# Altium PCB Servo Controller Board.PcbDoc
Units mm, origin at the board's own origin, x right, y up, seen from the top; angles counter-clockwise.
Board outline 99 x 43 mm, 2 copper layers (Top Layer, Bottom Layer), stack 1.57 mm thick; 27 components, 20 nets, 140 pads, 312 vias.
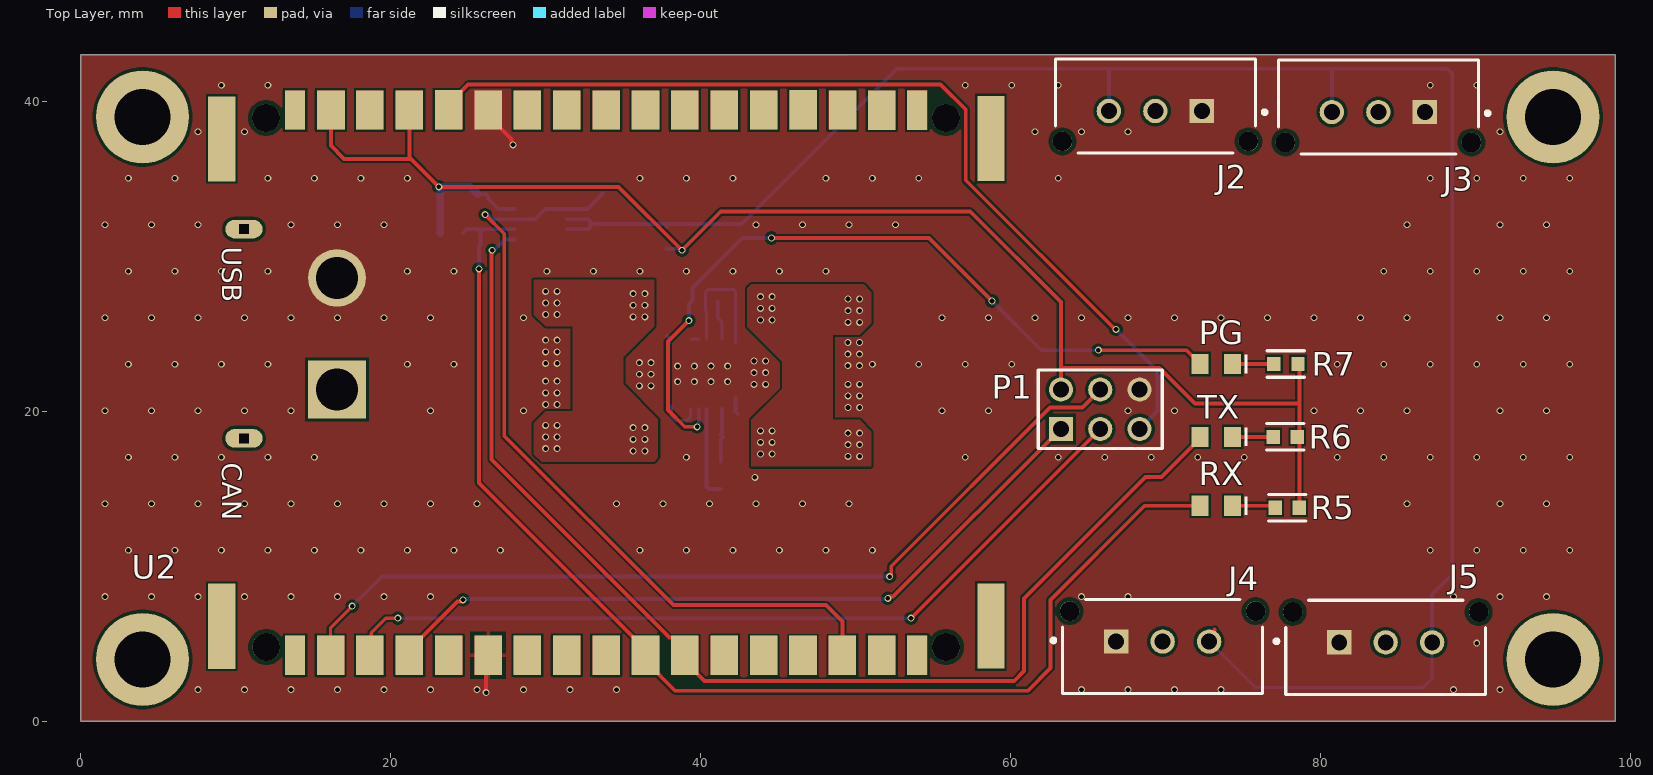
[diagram p0: Top Layer view]
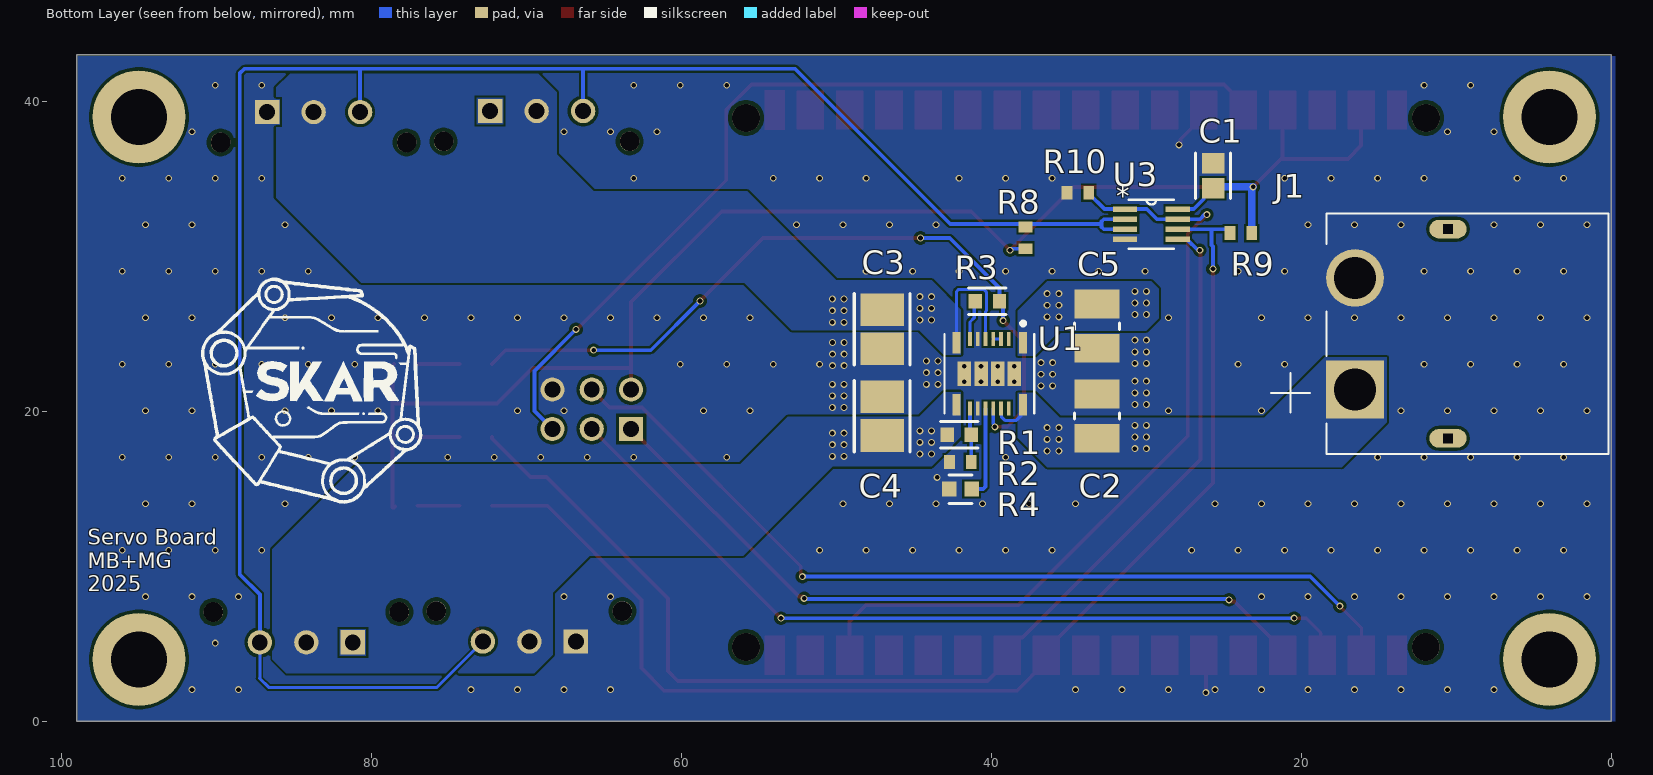
[diagram p1: Bottom Layer view, seen from below]
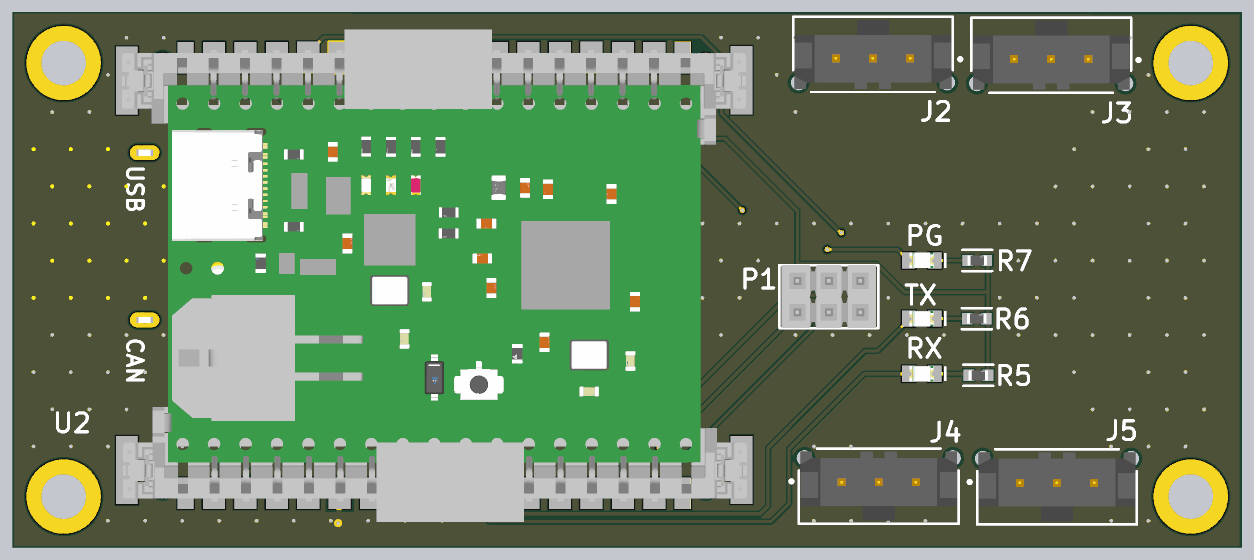
[diagram p2: 3D render of the assembled board from above, using the file's embedded part models]
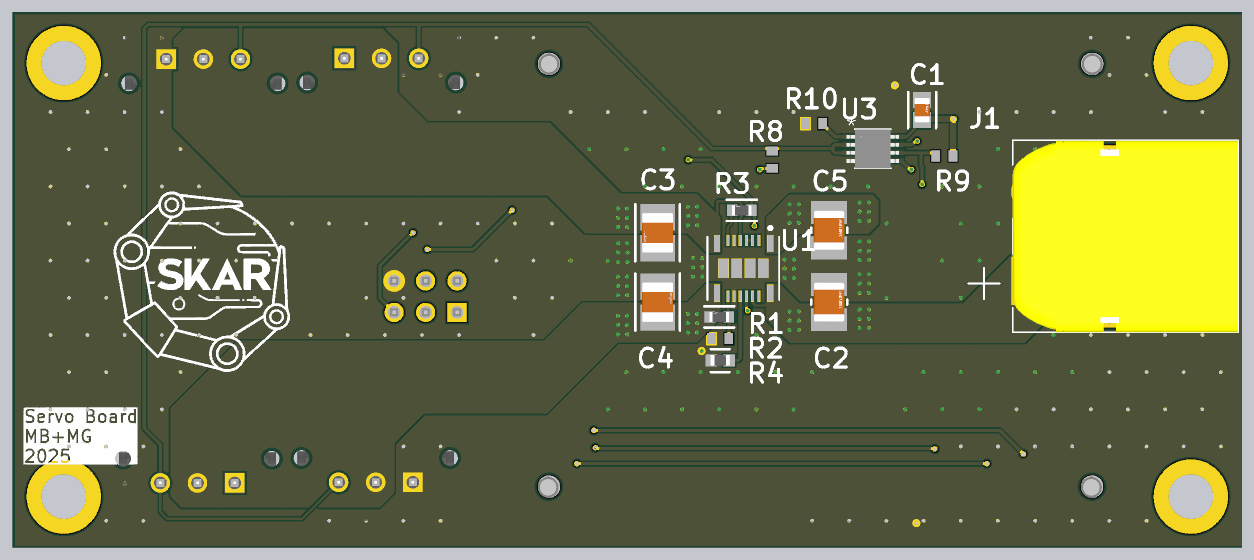
[diagram p3: 3D render of the assembled board from below, using the file's embedded part models]

## Layer stack, top to bottom
Top Solder: solder mask 0.0102, Solder Resist, Dk 3.5
Top Layer: signal copper 0.0356
Dielectric 1: core 1.4986, Core-043, Dk 4.3
Bottom Layer: signal copper 0.0356
Bottom Solder: solder mask 0.0102, Solder Resist, Dk 3.5

## Board outline
0,0 0,43 99,43 99,0

## Design rules (kind name [scope] priority, off if disabled: settings)
Clearance [All] p1: gap=0.254 ignorepadtopadclearanceinfootprint=FALSE except(0.1: Arc-Arc Arc-Track Track-Track; 0.127: Arc-THPad Arc-Fill Arc-Poly Arc-Region Track-THPad Track-Fill Track-Poly Track-Region SMDPad-SMDPad SMDPad-Fill SMDPad-Poly SMDPad-Region Fill-Fill Fill-Poly Fill-Region Poly-Poly Poly-Region Region-Region; 0.2: Arc-SMDPad Track-SMDPad THPad-Fill THPad-Poly THPad-Region Via-Fill Via-Poly Via-Region; 0.5: THPad-THPad)
ComponentClearance [All] p1: gap=0.127 collisioncheckmode=3 verticalgap=0.254 showdistances=FALSE
HoleSize [All] p1: absolutevalues=TRUE maxlimit=6.5 minlimit=0.025 maxpercent=80.000 minpercent=20.000
MinimumSolderMaskSliver [All] p1: minsoldermaskwidth=0.08
PlaneClearance [All] p1: clearance=0.2
PlaneConnect [All] p1: planeconnectstyle=Direct reliefexpansion=0.508 reliefentries=4 reliefconductorwidth=0.254 reliefairgap=0.254
PolygonConnect [All] p1: connectstyle=Direct reliefconductorwidth=0.254 reliefentries=4 polygonreliefangle="90 Angle" airgapwidth=0.254
RoutingVias [All] p1: holewidth=0.3 width=0.45 viastyle="Through Hole" minholewidth=0.3 minwidth=0.45 maxholewidth=5 maxwidth=5
SilkToSilkClearance [All] p1: silktosilkclearance=0
SilkToSolderMaskClearance [IsPad] p1: minsilkscreentomaskgap=0.15 clearancetoexposedcopper=TRUE
SolderMaskExpansion [All] p1: expansion=0.1 istentingtop=FALSE
SupplyNets "Schematic Supply Nets_1" [InNet('+5')] p1: voltage=0.000
SupplyNets "Schematic Supply Nets" [InNet('GND')] p2: voltage=0.000
Width [All] p1: maxlimit=0.5 minlimit=0.127 preferedwidth=0.2 minimp=50.000000 maximp=50.000000 favimp=50.000000
23 further rules are at their usual default settings.

## Components (designator, comment, footprint, x,y, rotation, side; value= is the part's Value field where it differs from the comment)
C1 "100nF" FP-0805-L_2_01_0_2-W_1_25-IPC_B 25.7,35.2 r90 bottom
C2 "10uF" FP-CL32-IPC_A 33.2,19.7 r90 bottom
C3 "47uF" FP-GRM32E-0_3-0_2-IPC_A 47.05,25.3 r270 bottom
C4 "47uF" FP-GRM32E-0_3-0_2-IPC_A 47.05,19.7 r90 bottom
C5 "10uF" FP-CL32-IPC_A 33.2,25.5 r90 bottom
J1 "XT60PW-M" AMASS_XT60PW-M 10.541,25.013 r270 bottom
J2 "43650-0328" FP-43650-0328-MFG 69.342,39.698 r0 top
J3 "43650-0328" FP-43650-0328-MFG 83.731,39.632 r0 top
J4 "43650-0328" FP-43650-0328-MFG 69.812,4.839 r180 top
J5 "43650-0328" FP-43650-0328-MFG 84.201,4.784 r180 top
P1 "MTSW-103-07-F-D-244" SMTC-MTSW-103-07-X-D-244 63.246,18.87 r0 top
PG "150080YS75000" WL-SMCW_0805_150080xx75000 73.279,23.061 r180 top
R1 "110k" FP-AC0603-IPC_B 42.073,18.5 r0 bottom
R2 "10k" RESC1608X55X25NL10T15 42,16.75 r180 bottom
R3 "100k" FP-AC0603-IPC_B 40.259,27.105 r0 bottom
R4 "6,49k" FP-CRCW0603-e3-IPC_B 42,15 r180 bottom
R5 "1k" FP-RC0603-0_55-IPC_B 77.851,13.79 r0 top
R6 "1k" FP-RC0603-0_55-IPC_B 77.724,18.362 r0 top
R7 "1k" FP-RC0603-0_55-IPC_B 77.766,23.061 r0 top
R8 "10k" RESC1608X55X25NL10T15 37.8,31.2 r270 bottom
R9 "10k" RESC1608X55X25NL10T15 23.9,31.5 r180 bottom
R10 "10k" RESC1608X55X25NL10T15 34.417,34.11 r180 bottom
RX "150080YS75000" WL-SMCW_0805_150080xx75000 73.279,13.917 r180 top
TX "150080YS75000" WL-SMCW_0805_150080xx75000 73.279,18.362 r180 top
U1 "PTPSM63606RDLR" RDL0020A-MFG 40.132,22.426 r270 bottom
U2 "CANduino on 299-017-299198-1 socket" "CANduino on 299-017-299198-1 socket" 33.655,21.283 r180 top locked
U3 "SN74LVC2G241DCTR" DCT8 29.681,32.078 r180 bottom

## Footprints (in the part's own frame and the unit in brackets; to place one, negate y for a bottom-side part, rotate by r counter-clockwise, add the part's x,y. Pads: shape width x height; smd on the part's side, far side on the other; paste and mask are expansions set on the pad)
AMASS_XT60PW-M [mm]
  rect 3.716x3.716 / inner round 3.716 / far side rect 3.716x3.716 hole 2.7: 1(3.6,-6)
  round 3.716 hole 2.7: 2(-3.6,-6)
  oval 1.2x2.4 hole 0.6 square: S1(6.75,0) S2(-6.75,0)
  silkscreen extent -7.75,-11.43 7.75,10.35, body extent -7.75,-7.85 7.75,10.35, height 8.4
"CANduino on 299-017-299198-1 socket" [mil]
  rect 50.79x100 smd: 1(780,670) 17(-800,670) 18(-800.11,-714.83) 34(780,-715)
  rect 70.08x100 smd: 2(690,670) 3(590,670) 4(490,670) 5(390,670) 6(290,670) 7(190,670) 8(90,670) 9(-10,670) 10(-110,670) 11(-210,670) 12(-310,670) 13(-410,670) 14(-510,670) 15(-610,670) 16(-710,670) 19(-709.78,-714.61) 20(-610.61,-715.01) 21(-510.24,-715.41) 22(-410,-715) 23(-310,-715) 24(-210,-715) 25(-110,-715) 26(-10,-715) 27(90,-715) 28(190,-715) 29(290,-715) 30(390,-716) 31(490,-715) 32(590,-715) 33(689,-715)
  round 70.87 hole 70.87 unplated: 35(-873,649) 36(-873,-695) 37(854,-695) 38(853.39,649)
  rect 68.9x216.54 smd: MP1(966.54,596.46) MP2(-987.2,595.47) MP3(-987.2,-642.72) MP4(966.54,-641.73)
  Top Layer region: -826.02,-765.37 -774.65,-765.37 -774.65,-664.73 -826.02,-664.73
  Top Layer region: -745,-765 -675,-765 -675,-665 -745,-665
  Top Layer region: -645,-765 -575,-765 -575,-665 -645,-665
  Top Layer region: -545,-765 -475,-765 -475,-665 -545,-665
  Top Layer region: -445,-765 -375,-765 -375,-665 -445,-665
  Top Layer region: -345,-765 -275,-765 -275,-665 -345,-665
  Top Layer region: -245,-765 -175,-765 -175,-665 -245,-665
  Top Layer region: -145,-765 -75,-765 -75,-665 -145,-665
  Top Layer region: -45,-765 25,-765 25,-665 -45,-665
  Top Layer region: 55,-765 125,-765 125,-665 55,-665
  Top Layer region: 155,-765 225,-765 225,-665 155,-665
  Top Layer region: 255,-765 325,-765 325,-665 255,-665
  Top Layer region: 355,-765 425,-765 425,-665 355,-665
  Top Layer region: 455,-765 525,-765 525,-665 455,-665
  Top Layer region: 555,-765 625,-765 625,-665 555,-665
  Top Layer region: 655,-765 725,-765 725,-665 655,-665
  Top Layer region: 755,-765 805.71,-765 805.71,-665 755,-665
  Top Layer region: 455,620 525,620 525,720 455,720
  Top Layer region: 355,620 425,620 425,720 355,720
  Top Layer region: -145,620 -75,620 -75,720 -145,720
  Top Layer region: -245,620 -175,620 -175,720 -245,720
  Top Layer region: -345,620 -275,620 -275,720 -345,720
  Top Layer region: 755,620 805.71,620 805.71,720 755,720
  Top Layer region: 655,620 725,620 725,720 655,720
  Top Layer region: 555,620 625,620 625,720 555,720
  Top Layer region: 255,620 325,620 325,720 255,720
  Top Layer region: 155,620 225,620 225,720 155,720
  Top Layer region: 55,620 125,620 125,720 55,720
  Top Layer region: -45,620 25,620 25,720 -45,720
  Top Layer region: -445,620 -375,620 -375,720 -445,720
  Top Layer region: -545,620 -475,620 -475,720 -545,720
  Top Layer region: -645,620 -575,620 -575,720 -645,720
  Top Layer region: -745,620 -675,620 -675,720 -745,720
  Top Layer region: -826.02,619.63 -774.65,619.63 -774.65,720.27 -826.02,720.27
  body extent -1004,-804 982,761, height 515
DCT8 [mil]
  rect 61.5x14 smd paste-30.75 mask-31: 1(-66.75,38.39) 2(-66.75,12.8) 3(-66.75,-12.8) 4(-66.75,-38.39) 5(66.75,-38.39) 6(66.75,-12.8) 7(66.75,12.8) 8(66.75,38.39)
  silkscreen extent -57,-62 57,62, body extent -84,-62 84,62, height 51
FP-0805-L_2_01_0_2-W_1_25-IPC_B [mm]
  rect 1.305x1.456 smd paste+0 mask+0: 1(-0.806,0) 2(0.806,0)
  silkscreen extent -1.46,-1.13 1.46,1.13, body extent -1,-0.63 1,0.63, height 1.4
FP-43650-0328-MFG [mm]
  rect 1.57x1.57 hole 1.02 paste-2539.97 mask+0: 1(3,-0.315)
  round 1.57 hole 1.02 paste-2539.97 mask+0: 2(0,-0.315) 3(-3,-0.315)
  round 1.27 hole 1.27 unplated paste-2539.97 mask+0: ""(-6,-2.275) ""(6,-2.275)
  silkscreen extent -6.45,-3.04 7.18,3.04, body extent -6.74,-3.14 6.74,3.14, height 0.25
FP-AC0603-IPC_B [mm]
  rect 0.859x0.912 smd paste+0 mask+0: 1(-0.777,0) 2(0.777,0)
  silkscreen extent -1.21,-0.86 1.21,0.86, body extent -0.8,-0.4 0.8,0.4, height 0.55
FP-CL32-IPC_A [mm]
  rect 1.853x2.904 smd paste+0 mask+0: 1(-1.425,0) 2(1.425,0)
  silkscreen extent -0.2,-1.45 0.2,1.45, body extent -1.6,-1.25 1.6,1.25, height 2.8
FP-CRCW0603-e3-IPC_B [mm]
  rect 0.935x0.962 smd paste+0 mask+0: 1(-0.715,0) 2(0.715,0)
  silkscreen extent -0.75,-0.95 0.75,0.9, body extent -0.77,-0.43 0.77,0.43, height 0.5
FP-GRM32E-0_3-0_2-IPC_A [mm]
  rect 2.103x2.806 smd paste+0 mask+0: 1(-1.251,0) 2(1.251,0)
  silkscreen extent -2.3,-1.8 2.3,1.8, body extent -1.6,-1.25 1.6,1.25, height 2.7
FP-RC0603-0_55-IPC_B [mm]
  rect 0.859x0.912 smd paste+0 mask+0: 1(-0.777,0) 2(0.777,0)
  silkscreen extent -1.21,-0.86 1.21,0.86, body extent -1.46,-0.71 1.46,0.71, height 0.25
RDL0020A-MFG [mm]
  rect 1.4x0.5 smd paste-0.687 mask+0: 1(-2,2.175) 8(-2,-2.125) 9(2,-2.125) 16(2,2.175)
  rect 0.9x0.25 smd paste-0.437 mask+0: 2(-2.25,1.25) 3(-2.25,0.75) 4(-2.25,0.25) 5(-2.25,-0.25) 6(-2.25,-0.75) 7(-2.25,-1.25) 10(2.25,-1.25) 11(2.25,-0.75) 12(2.25,-0.25) 13(2.25,0.25) 14(2.25,0.75) 15(2.25,1.25)
  rect 1.58x0.875 smd paste-0.777 mask+0: 17(0,1.613) 18(0,0.538) 19(0,-0.538) 20(0,-1.613)
  silkscreen extent -3.37,-2.9 2.55,2.9
RESC1608X55X25NL10T15 [mm] "Chip Resistor, 2-Leads, Body 1.70x0.90mm, IPC Medium Density"
  rect 0.7x0.9 smd: 1(-0.7,0) 2(0.7,0)
  body extent -0.85,-0.45 0.85,0.45, height 0.55
SMTC-MTSW-103-07-X-D-244 [mm] "Assembly .025\" [.64] SQ Post Terminal Strip, 2x3 Pins, Vertical, 2.54mm Pitch, Male"
  rect 1.55x1.55 hole 1.02: 1(0,0)
  round 1.55 hole 1.02: 2(0,2.54) 3(2.54,0) 4(2.54,2.54) 5(5.08,0) 6(5.08,2.54)
  silkscreen extent -1.46,-1.27 6.54,3.81, body extent -1.27,-1.27 6.35,3.81, height 8.74
WL-SMCW_0805_150080xx75000 [mm] "SMD Mono-color Chip LED, body 2.0x1.25mm"
  rect 1.1x1.3 smd: 1(-1.05,0) 2(1.05,0)
  silkscreen extent -2,-0.6 -1.8,0.6, body extent -1,-0.63 1,0.62, height 0.7

## Part data
C1: library part CMP-2007-04172-2, "Automotive Ceramic Capacitor, 0805, 100nF, 10%, X7R, 15%, 100V", Case Code (Imperial)=0805, Case Code (Metric)=2012, Dielectric=X7R, Dielectric Material=Ceramic, Max Operating Temperature=125°C, Min Operating Temperature=-55°C, Package Quantity=1, Ratings=AEC-Q200, Tolerance=10%, Voltage=100V, Capacitance=100nF, Case/Package=0805, Construction=Flat, Depth=1.25mm, Height=1.4mm, Lead Free="Lead Free", Length=2.01mm, Mount="Surface Mount", Number of Pins=2, Packaging="Tape and Reel", Radiation Hardening=No, REACH SVHC="No SVHC", RoHS Compliant=Yes, Series=-, Termination=SMD/SMT, Thickness=0.055inch, Voltage Rating=100V, Voltage Rating (DC)=100V, Width=0.049inch
C2 C5: library part CMP-13271-002443-1, "Cap Ceramic 10uF 35V X7R ±10% SMD 1210 +125°C Embossed T/R", Case Code (Imperial)=1210, Case Code (Metric)=3225, Dielectric=X7R, Max Operating Temperature=125°C, Min Operating Temperature=-55°C, Package Quantity=1, Tolerance=10%, Voltage=35V, Capacitance=10uF, Case/Package=1210, Depth=2.5mm, Height=1.8mm, Lead Free="Lead Free", Length=3.2mm, Material=Ceramic, Mount="Surface Mount", Packaging="Tape and Reel", Radiation Hardening=No, Thickness=0.079inch, Voltage Rating=35V, Width=0.098inch
C3 C4: library part CMP-06035-000110-2, "Chip Multilayer Ceramic Capacitors for General Purpose, 1210, 47uF, X6S, 22%, 10%, 16V", Case Code (Imperial)=1210, Case Code (Metric)=3225, Dielectric=X6S, Max Operating Temperature=105°C, Min Operating Temperature=-55°C, Package Quantity=1000, Tolerance=10%, Voltage=16V, Capacitance=47uF, Case/Package=1210, Depth=2.5mm, Height=2.5mm, Lead Free="Lead Free", Length=3.2mm, Material=Ceramic, Mount="Surface Mount", Packaging="Tape and Reel", REACH SVHC="No SVHC", Termination=SMD/SMT, Thickness=0.106inch, Voltage Rating=16V, Voltage Rating (DC)=16V, Weight=0.00388oz, Width=2.5mm
J1: "Socket, DC supply, male, PIN: 2", Package=Package, Availability="Not in stock", Check_prices=https://www.snapeda.com/parts/XT60PW-M/AMASS/view-part/?ref=eda, MF=AMASS, MP=XT60PW-M, Price=None, SnapEDA_Link=https://www.snapeda.com/parts/XT60PW-M/AMASS/view-part/?ref=snap
J2 J3 J4 J5: library part CMP-00257-07661218-1, "43650-0328 Connector Header HDR 3 POS 3mm Solder ST Thru-Hole 3 Terminal 1 Port Micro-Fit 3.0 Tray", Current Rating=5A, Manufacturer Lifecycle Status=ACTIVE, Max Operating Temperature=125°C, Min Operating Temperature=-40°C, Voltage Rating=600V, Contact Material="Brass, Gold, Nickel", Contact Plating=Gold, Country of Origin=US, Glow Wire Compliant=Compliant, Halogen Free="Low Halogen", Height=10.15mm, Housing Material=Thermoplastic, Lifecycle Status=Production, Mount="Through Hole", NexarPartId=7661218, Number of Circuits=3, Number of Contacts=3, Number of Positions=3, Number of Rows=1, Orientation=Vertical, Pitch=3mm, Plating=Tin, Radiation Hardening=No, RoHS=Compliant, Schedule B=8536694040, Termination="Through Hole"
P1: library part CMP-1024-00098-1, "Modified .025\" SQ Post Header, Through-hole, Vertical, -55 to 125 degC, 2.54 mm Pitch, 6-Pin, Male, RoHS", Manufacturer=Samtec, Temperature Range="-55 to 125 degC", ComponentLink1Description="Manufacturer URL", ComponentLink1URL=http://www.samtec.com, ComponentLink2Description=Datasheet, ComponentLink2URL=http://www.samtec.com/documents/webfiles/pdf/MTSW.PDF, ComponentLink3Description="Package Specification", ComponentLink3URL=http://www.samtec.com/documents/webfiles/cpdf/MTSW-XXX-XX-X-X-XXXX-XX-XXX-MKT1.pdf, DatasheetVersion=F-214, Mounting Technology=Through-hole, Orientation=Vertical, PackageDescription="Assembly .025\" [.64] SQ Post Terminal Strip", PackageReference=MTSW-103-07-X-D-244, PackageVersion="BI, 2/1987", PartNumber=MTSW-103-07-F-D-244, Pitch="2.54 mm", RoHS=True
PG RX TX: library part CMP-1426-00012-3, "2 V Yellow LED 2012 (0805) SMD, Wurth Elektronik WL-SMCW 150080YS75000", Case Code (Imperial)=0805, Case Code (Metric)=2012, Color=Yellow, Forward Current=100mA, Forward Voltage=2V, Max Junction Temperature (Tj)=95°C, Max Operating Temperature=85°C, Max Reverse Voltage (DC)=5V, Min Operating Temperature=-40°C, Power Dissipation=72mW, Test Current=20mA, Case/Package=0805, Dominant Wavelength=590nm, Height=700µm, Length=2mm, Lens Style="Clear, Rectangular", Luminous Intensity=120mcd, Mount="Surface Mount", Packaging="Tape and Reel", Peak Wavelength=595nm, REACH SVHC=Unknown, Reverse Voltage=5V, RoHS=Compliant, Viewing Angle=140°, Wavelength=590nm, Width=1.25mm
R1: library part CMP-03412-026184-2, "RES 110KΩ 1.00% 0.1W 0603", Case Code (Imperial)=0603, Case Code (Metric)=1608, Max Operating Temperature=155°C, Max Power Dissipation=100mW, Min Operating Temperature=-55°C, Resistance=110kR, Resistor Type="Thick Film", Temperature Coefficient=100ppm/°C, Tolerance=1%, Voltage Rating=50V, Case/Package=0603, Features="Moisture Resistant", Height=0.022inch, Length=0.063inch, Number of Terminations=2, Packaging="Tape and Reel", Power Rating=100mW, RoHS Compliant=Yes, Series=AC, Termination=SMD/SMT, Width=0.8mm
R2 R8 R9 R10: library part CMP-2000-05022-1, "Resistor, 10 KOhm, +/- 5%, 100 mW, -55 to 155 degC, 0603 (1608 Metric), RoHS, Tape and Reel", Case Code - in=0603, Case Code - mm=1608, Manufacturer=Yageo, Operating Temperature Range=-55Cto+155C, Package Description="2-Pin Surface Mount Device, Body 1.6 x 0.8 mm", Package Reference=603, Power Rating=100mW, Resistance=10kOhms, Temperature Coefficient=100PPM/C, Tolerance=5%, Voltage Rating=50V, Datasheet URL=http://www.farnell.com/datasheets/443971.pdf, Datasheet Version="Rev. 4, 04/2009", Manufacturer URL=http://www.yageo.com/, Packaging=Reel, Product=ThickFilmResistorsGeneralPurpose, Series=RC, Termination Style=SMD/SMT
R3: library part CMP-2000-04816-3, "RES 100KΩ 1.00% 0.1W 0603", Case Code (Imperial)=0603, Case Code (Metric)=1608, Max Operating Temperature=155°C, Max Power Dissipation=100mW, Min Operating Temperature=-55°C, Package Quantity=1, Ratings=AEC-Q200, Resistance=100kR, Resistor Type="Thick Film", Temperature Coefficient=100ppm/°C, Tolerance=1%, Voltage Rating=50V, Working Voltage=75V, Case/Package=0603, Construction=Rectangular, Depth=0.8mm, Features="Moisture Resistant", Height=0.022inch, Lead Free="Lead Free", Length=1.6mm, Military Standard=Not, Moisture Sensitivity Level=1, Number of Terminations=2, Packaging="Tape and Reel", Power Rating=100mW, RoHS Compliant=Yes, Series=AC, Technology="THICK FILM", Termination=SMD/SMT, Width=0.031inch
R4: library part CMP-2000-03548-2, "RES Thick Film, 6.49kΩ, 1%, 0.1W, 100ppm/°C, 0603", Case Code (Imperial)=0603, Case Code (Metric)=1608, Max Operating Temperature=155°C, Max Power Dissipation=100mW, Min Operating Temperature=-55°C, Package Quantity=10, Resistance=6.49kR, Temperature Coefficient=100ppm/°C, Tolerance=1%, Voltage Rating=75V, Case/Package=0603, Composition="Thick Film", Contact Plating=Tin, Depth=0.85mm, Features="Automotive AEC-Q200", Height=0.45mm, Length=1.55mm, Military Standard=Not, Number of Pins=2, Number of Terminations=2, Packaging="Tape and Reel", Power Rating=100mW, Radiation Hardening=No, Termination=SMD/SMT, Weight=7.1E-05oz, Width=0.033inch
R5 R6 R7: library part CMP-1659-00009-5, "RES 1K OHM 1% 1/10W 0603", Case Code (Imperial)=0603, Case Code (Metric)=1608, Max Operating Temperature=155°C, Max Power Dissipation=100mW, Min Operating Temperature=-55°C, Resistance=1kR, Resistance Tolerance=1%, Resistor Type="Thick Film", Temperature Coefficient=100ppm/°C, Voltage Rating=50V, Case/Package=0603, Construction=Rectangular, Contact Plating=Tin, Depth=0.8mm, Features="Moisture Resistant", Height=0.45mm, Lead Free="Lead Free", Length=1.6mm, Military Standard=Not, Number of Terminations=2, Packaging="Tape and Reel", Power Rating=100mW, Radiation Hardening=No, REACH SVHC="No SVHC", RoHS Compliant=Yes, Series=RC, Size Code=0603, Technology="THICK FILM", Termination=SMD/SMT, Tolerance=1%
U1 U3: "No Description Available", Mfr_Name="Texas Instruments", RefDes=RefDes
  U1: TYPE=TYPE
  U3: TYPE=Type
U2: "CANduino board without pins 1, 17, 18 and 34 due to socket specification"

## Free pads (board coordinates)
  round 6 hole 3.6 paste-2539.97 mask+0.102: ""(4,4) ""(4,39) ""(95,4) ""(95,39)

## Via types
v1: diameter 0.45, hole 0.3, Top Layer to Bottom Layer, tented both sides, 292 vias
v2: diameter 0.45, hole 0.3, Top Layer to Bottom Layer, 20 vias

## Nets (pads, with @x,y where several pads share a name; then routed paths per layer and width w, separated by ;. In a path a pad name is that pad's centre, name@x,y a point inside that pad or via, vN(x,y) a via of type N, cw(c..) or ccw(c..) an arc to the next point about the centre after c; other vN are vias at no path point)
+5: C1.1 P1.2 R5.2 R6.2 R7.2 R8.2 R9.2 U2.31 U2.33 U3.8 | length 100.3
  Top Layer w0.254: U2.33 16.154,37.146 17,36.3 21.305,36.3 v2(23.114,34.491) 34.709,34.491 v2(38.8,30.4) 41.3,32.9 57.4,32.9 63.246,27.054 63.246,22.8 ; 21.209,36.3 U2.31 ; P1.2 63.246,22.8 ; R6.2@78.401,18.362 R6.2@78.464,18.299 ; R5.2@78.464,13.854 R5.2@78.528,13.79 ; R7.2 78.628,22.976 78.628,20.5 ; R5.2 78.628,18.362 78.628,20.5 ; 63.246,22.8 69.6,22.8 71.9,20.5 78.628,20.5
  Bottom Layer w0.2: C1.1@25.626,34.011 25.626,34.32 C1.1
  Bottom Layer w0.25: C1.1@25.626,34.011 26.159,34.011 26.303,33.867 26.303,33.697 26.947,33.053 U3.8 ; R8.2 38.646,30.5 38.746,30.4 v2(38.8,30.4)
  Bottom Layer w0.5: R9.2 23.2,34.405 v2(23.114,34.491) 25.146,34.491 C1.1@25.626,34.011
DATA_SERVO: J2.3 J3.3 J4.3 J5.3 R8.1 U3.2 U3.3 | length 125.5
  Top Layer w0.25: J4.3 72.812,5.511 73.169,5.869 73.169,5.937
  Bottom Layer w0.2: J4.3 75.766,2.2 86.634,2.2 87.217,2.783 87.201,2.799 J5.3
  Bottom Layer w0.25: U3.3 32.754,31.753 32.9,31.899 32.9,32.1 ; U3.2 32.494,32.403 32.754,32.403 32.9,32.257 32.9,32.1 ; R8.1 R8.1@37.8,32.1 ; J2.3 66.342,42.111 ; J3.3 80.731,42.111 ; J5.3 87.201,8.2 88.5,9.499 88.5,41.8 88.189,42.111 80.731,42.111 ; 32.9,32.1 37.338,32.1 R8.1@37.8,32.1 ; R8.1@37.8,32.1 42.658,32.1 52.67,42.111 66.342,42.111 ; 66.342,42.111 80.731,42.111
GND: C1.2 C2.2 C3.2 C4.2 C5.1 J1.2 J2.1 J3.1 J4.1 J5.1 P1.6 R2.1 R4.1 R10.1 U1.6 U1.11 U1.17 U1.18 U1.19 U1.20 U2.6 U2.29 U3.4 | length 5.4
  Top Layer w0.25: v2(26.162,1.852) 26.162,4.138 U2.6 ; U2.29 26.289,39.064 27.795,37.558 27.795,37.305 v2(27.9,37.2)
  other v1: 7.577,2.045 10.577,2.045 13.577,2.045 16.577,2.045 19.577,2.045 22.577,2.045 25.577,2.045 28.577,2.045 31.577,2.045 34.577,2.045 64.577,2.045 67.577,2.045 70.577,2.045 73.577,2.045 88.577,2.045 91.577,2.045 90.077,5.045 1.577,8.045 4.577,8.045 7.577,8.045 10.577,8.045 13.577,8.045 16.577,8.045 19.577,8.045 22.577,8.045 64.577,8.045 67.577,8.045 88.577,8.045 91.577,8.045 94.577,8.045 3.077,11.045 6.077,11.045 9.077,11.045 12.077,11.045 15.077,11.045 18.077,11.045 21.077,11.045 24.077,11.045 27.077,11.045 36.077,11.045 39.077,11.045 42.077,11.045 45.077,11.045 48.077,11.045 51.077,11.045 87.077,11.045 90.077,11.045 93.077,11.045 96.077,11.045 1.577,14.045 4.577,14.045 7.577,14.045 10.577,14.045 13.577,14.045 16.577,14.045 19.577,14.045 22.577,14.045 25.577,14.045 34.577,14.045 37.577,14.045 40.577,14.045 43.577,14.045 46.577,14.045 49.577,14.045 85.577,14.045 91.577,14.045 94.577,14.045 3.077,17.045 6.077,17.045 9.077,17.045 12.077,17.045 15.077,17.045 39.077,17.045 57.077,17.045 63.077,17.045 66.077,17.045 69.077,17.045 72.077,17.045 75.077,17.045 81.077,17.045 84.077,17.045 87.077,17.045 90.077,17.045 93.077,17.045 96.077,17.045 1.577,20.045 4.577,20.045 7.577,20.045 10.577,20.045 13.577,20.045 22.577,20.045 28.577,20.045 55.577,20.045 58.577,20.045 67.577,20.045 70.577,20.045 79.577,20.045 82.577,20.045 85.577,20.045 91.577,20.045 94.577,20.045 49.514,20.252 50.264,20.252 30,20.45 30.75,20.45 49.514,21.002 50.264,21.002 30,21.2 30.75,21.2 36.05,21.65 36.8,21.65 43.45,21.75 44.2,21.75 49.514,21.752 50.264,21.752 38.519,21.926 39.594,21.926 40.67,21.926 41.745,21.926 30,21.95 30.75,21.95 36.05,22.4 36.8,22.4 43.45,22.5 44.2,22.5 38.519,22.926 39.594,22.926 40.67,22.926 41.745,22.926 49.5,22.95 50.25,22.95 3.077,23.045 6.077,23.045 9.077,23.045 12.077,23.045 21.077,23.045 24.077,23.045 51.077,23.045 54.077,23.045 57.077,23.045 60.077,23.045 81.077,23.045 84.077,23.045 87.077,23.045 90.077,23.045 93.077,23.045 96.077,23.045 30,23.1 30.75,23.1 36.05,23.15 36.8,23.15 43.45,23.25 44.2,23.25 49.5,23.7 50.25,23.7 30,23.85 30.75,23.85 49.5,24.45 50.25,24.45 30,24.6 30.75,24.6 1.577,26.045 4.577,26.045 7.577,26.045 10.577,26.045 13.577,26.045 16.577,26.045 19.577,26.045 22.577,26.045 28.577,26.045 55.577,26.045 58.577,26.045 61.577,26.045 64.577,26.045 67.577,26.045 70.577,26.045 73.577,26.045 76.577,26.045 79.577,26.045 82.577,26.045 85.577,26.045 91.577,26.045 94.577,26.045 3.077,29.045 6.077,29.045 9.077,29.045 12.077,29.045 21.077,29.045 24.077,29.045 30.077,29.045 33.077,29.045 36.077,29.045 39.077,29.045 42.077,29.045 45.077,29.045 48.077,29.045 84.077,29.045 87.077,29.045 90.077,29.045 93.077,29.045 96.077,29.045 1.577,32.045 4.577,32.045 7.577,32.045 13.577,32.045 16.577,32.045 19.577,32.045 43.577,32.045 46.577,32.045 49.577,32.045 52.577,32.045 85.577,32.045 91.577,32.045 94.577,32.045 3.077,35.045 6.077,35.045 12.077,35.045 15.077,35.045 18.077,35.045 21.077,35.045 36.077,35.045 39.077,35.045 42.077,35.045 48.077,35.045 51.077,35.045 54.077,35.045 63.077,35.045 87.077,35.045 90.077,35.045 93.077,35.045 96.077,35.045 7.577,38.045 10.577,38.045 61.577,38.045 64.577,38.045 67.577,38.045 91.577,38.045 9.077,41.045 12.077,41.045 57.077,41.045 60.077,41.045 63.077,41.045 87.077,41.045 90.077,41.045
  other v2: 43.5,15.75
MOSI: P1.4 U2.2 | length 58.5
  Top Layer w0.2: U2.2 16.129,6.043 v2(17.526,7.44)
  Top Layer w0.25: v2(52.197,9.345) 52.302,9.45 52.302,10.012 62.546,20.256 64.632,20.256 P1.4
  Bottom Layer w0.25: v2(17.526,7.44) 19.431,9.345 v2(52.197,9.345)
  Bottom Layer w0.254: P1.4@65.786,21.059 P1.4
NetP1_1: P1.1 U2.4 | length 48.3
  Top Layer w0.25: v2(52.077,7.945) 52.182,8.05 52.426,8.05 P1.1
  Top Layer w0.254: U2.4 21.209,4.645 24.305,7.741 24.573,7.741 v2(24.677,7.845)
  Bottom Layer w0.25: v2(24.677,7.845) 24.727,7.895 52.027,7.895 v2(52.077,7.945)
NetP1_3: P1.3 U2.3 | length 54
  Top Layer w0.2: U2.3 18.669,4.645 18.75,4.726 18.75,5.718 19.691,6.659 v2(20.466,6.659)
  Top Layer w0.25: v2(53.575,6.659) P1.3
  Bottom Layer w0.25: v2(20.466,6.659) v2(53.575,6.659)
NetPG_1: PG.1 R7.1 | length 2.8
  Top Layer w0.25: PG.1 R7.1@77.089,23.061
NetPG_2: PG.2 R3.1 U1.13 | length 49.5
  Top Layer w0.25: v2(39.243,25.855) 37.89,24.502 37.89,20.096 38.976,19.01 v2(39.778,19.01) ; v2(44.577,31.189) 54.737,31.189 v2(58.801,27.125) ; v2(65.659,23.95) 71.34,23.95 PG.2
  Bottom Layer w0.2: v2(39.778,19.01) 39.778,19.078 39.882,19.182 U1.13
  Bottom Layer w0.25: v2(39.243,25.855) 39.243,26.939 39.471,27.167 39.471,27.971 42.689,31.189 v2(44.577,31.189) ; v2(58.801,27.125) 61.976,23.95 v2(65.659,23.95)
NetR1_1: R1.1 R2.2 U1.10 | length 3.6
  Bottom Layer w0.25: R2.2 41.3,18.197 41.45,18.347 R1.1 41.382,18.585 U1.10
NetR3_2: R3.2 U1.7 | length 2.5
  Bottom Layer w0.2: R3.2@41.109,27.105 41.109,26.042 41.382,25.769 U1.7
NetR5_1: R5.1 RX.1 | length 2.7
  Top Layer w0.25: RX.1 R5.1@77.047,13.917
NetR6_1: R6.1 TX.1 | length 2.7
  Top Layer w0.25: TX.1 R6.1@77.047,18.362
NetU1_3: U1.3 U1.4 | length 0.5
  Bottom Layer w0.2: U1.3 U1.4
PinDigital: P1.5 U2.30 | length 61.2
  Top Layer w0.254: U2.30 23.749,39.825 25.005,41.081 25.005,41.106 55.471,41.106 57.11,39.467 57.11,34.916 66.628,25.398 66.649,25.398 66.747,25.3 v2(66.8,25.3)
  Bottom Layer w0.25: v2(66.8,25.3) 69.482,22.618 69.482,20.026 P1.5
POWER_SERVO: C3.1 C4.1 J2.2 J3.2 J4.2 J5.2 R1.2 U1.5 U1.8 U1.9 | length 9.5
  Bottom Layer w0.2: U1.5 40.382,26.449 40.306,26.525 40.306,27.686 40.482,27.861 42.139,27.861 42.257,27.743 U1.8
  Bottom Layer w0.25: U1.9@42.257,20.876 U1.9 42.257,19.976 U1.9@42.382,19.851
  other v1: 49.514,17.102 50.264,17.102 43.864,17.252 44.614,17.252 49.514,17.852 50.264,17.852 43.864,18.002 44.614,18.002 49.514,18.602 50.264,18.602 43.864,18.752 44.614,18.752 49.514,25.752 50.264,25.752 43.864,25.902 44.614,25.902 49.514,26.502 50.264,26.502 43.864,26.652 44.614,26.652 49.514,27.252 50.264,27.252 43.864,27.402 44.614,27.402
RT: R4.2 U1.12 | length 6
  Bottom Layer w0.25: U1.12 40.382,15.146 40.528,15 R4.2
RX: R9.1 RX.2 U2.10 U3.6 | length 79.9
  Top Layer w0.25: 62.577,7.845 68.649,13.917 RX.2
  Top Layer w0.254: v2(25.7,29.2) 25.7,15.394 36.449,4.645 36.449,3.885 38.355,1.979 61.111,1.979 62.577,3.445 62.577,7.845
  Bottom Layer w0.2: R9.1@24.65,31.5 R9.1@24.903,31.753
  Bottom Layer w0.25: R9.1@24.903,31.753 25.7,31.753 25.777,31.753 U3.6 ; v2(25.7,29.2) 25.7,30.646 25.8,30.746 25.8,31.753
TX: TX.2 U2.11 U3.5 | length 76.7
  Top Layer w0.25: 62.577,9.645 68.699,15.767 69.734,15.767 72.229,18.262 TX.2
  Top Layer w0.254: v2(26.556,30.4) 26.5,30.344 26.5,16.9 37.992,5.408 38.226,5.408 38.989,4.645 38.989,3.885 40.266,2.608 60.24,2.608 60.877,3.245 60.877,7.945 62.577,9.645
  Bottom Layer w0.25: v2(26.556,30.4) 26.679,30.4 27.382,31.103 U3.5
TX_Enable: R10.2 U2.15 U3.1 U3.7 | length 52.2
  Top Layer w0.25: v2(26.1,32.7) 27.335,31.465 27.335,18.415 38.25,7.5 48.1,7.5 49.149,6.451 U2.15
  Bottom Layer w0.25: v2(26.1,32.7) 26.249,32.7 26.546,32.403 29.33,32.403 29.98,33.053 U3.1 32.71,33.053 R10.2@33.667,34.01
  Bottom Layer w0.254: R10.2@33.667,34.01 R10.2@33.667,34.11
VBAT: C2.1 C5.2 J1.1 U1.1 U1.14 U1.16 | length 3.3
  Bottom Layer w0.2: U1.16 38.107,20.276 38.107,19.713 38.394,19.426 39.131,19.426 39.357,19.652 39.357,20.151 U1.14
  Bottom Layer w0.254: U1.1@37.834,24.884 37.957,24.761 U1.1
  other v1: 35.65,17.45 36.4,17.45 30,17.6 30.75,17.6 35.65,18.2 36.4,18.2 30,18.35 30.75,18.35 35.65,18.95 36.4,18.95 30,19.1 30.75,19.1 35.65,26.1 36.4,26.1 30,26.25 30.75,26.25 35.65,26.85 36.4,26.85 30,27 30.75,27 35.65,27.6 36.4,27.6 30,27.75 30.75,27.75
pads on no net: J1.S1 J1.S2 J2. J3. J4. J5. U1.2 U1.15 U2.1 U2.5 U2.7 U2.8 U2.9 U2.12 U2.13 U2.14 U2.16 U2.17 U2.18 U2.19 U2.20 U2.21 U2.22 U2.23 U2.24 U2.25 U2.26 U2.27 U2.28 U2.32 U2.34 U2.35 U2.36 U2.37 U2.38 U2.MP1 U2.MP2 U2.MP3 U2.MP4

## Polygon pours and split planes (outlines as drawn)
GND on Bottom Layer "GND_L02_P015" (solid, pour order 15): -0.235,0 98.933,0 98.933,42.908 -0.235,42.908
POWER_SERVO on Bottom Layer "NONET_L-01_P-001" (solid, pour order 14): 48.75,25.248 48.75,28.3 49.85,28.3 55.75,34.2 65.65,34.2 68.05,36.6 68.05,40.6 69.25,41.8 85.25,41.8 86.15,40.9 86.15,33.8 80.65,28.3 55.95,28.3 52.898,25.248
POWER_SERVO on Bottom Layer "NONET_L-01_P-001" (solid, pour order 13): 49,19.652 49,16.6 50.1,16.6 56,10.7 65.9,10.7 68.3,8.3 68.3,4.3 69.5,3.1 85.5,3.1 86.4,4 86.4,11.1 80.9,16.6 56.2,16.6 53.148,19.652
POWER_SERVO on Bottom Layer "NONET_L-01_P-001" (solid, pour order 10): 41.964,18.352 43.864,16.452 50.564,16.452 51.064,16.952 51.064,18.852 50.264,19.652 44.664,19.652 43.064,21.252 41.964,21.252
VBAT on Bottom Layer "NONET_L-01_P-001" (solid, pour order 11): 31.4,16.4 31.4,19.6 22.4,19.6 18.5,23.5 14.5,23.5 14.5,19.3 17.4,16.4
POWER_SERVO on Bottom Layer "NONET_L-01_P-001" (solid, pour order 8): 41.964,26.552 43.864,28.452 50.564,28.452 51.064,27.952 51.064,26.052 50.264,25.252 44.664,25.252 43.064,23.652 41.964,23.652
VBAT on Bottom Layer "NONET_L-01_P-001" (solid, pour order 7): 38.3,26.5 36.4,28.4 29.7,28.4 29.2,27.9 29.2,26 30,25.2 35.6,25.2 37.2,23.6 38.3,23.6
VBAT on Bottom Layer "NONET_L-01_P-001" (solid, pour order 6): 38.3,18.3 36.4,16.4 29.7,16.4 29.2,16.9 29.2,18.8 30,19.6 35.6,19.6 37.2,21.2 38.3,21.2
GND on Top Layer "GND_L01_P012" (solid, pour order 12): 0,0 98.933,0 98.933,42.933 0,43
POWER_SERVO on Top Layer "NONET_L-01_P-001" (solid, pour order 9): 51.014,16.452 43.264,16.452 43.264,19.452 45.264,21.452 45.264,23.202 43.014,25.452 43.014,27.952 43.264,28.202 50.514,28.202 51.014,27.702 51.014,25.702 50.264,24.952 48.514,24.952 48.514,19.452 50.264,19.452 51.014,18.702
VBAT on Top Layer "NONET_L-01_P-001" (solid, pour order 5): 29.25,28.5 37,28.5 37,25.5 35,23.5 35,21.75 37.25,19.5 37.25,17 37,16.75 29.75,16.75 29.25,17.25 29.25,19.25 30,20 31.75,20 31.75,25.5 30,25.5 29.25,26.25

## Silkscreen, mask and mechanical layers (free items; w line width, h text height)
Bottom Overlay:
  drawing of 13 lines, arcs and shapes, not listed
  text "Servo Board / MB+MG / 2025" at 98.3,8.391 h1
Board:
  the board outline again, w0.254

## Text inside footprints (layer, text, board x,y; h text height)
U2: Top Overlay "USB" at 9.149,30.614 h1.27 r270; Top Overlay "CAN" at 9.149,16.677 h1.27 r270; Mechanical 1 "CAN-PORT" at 14.155,18.482 h1 r270; Mechanical 1 "USB-PORT" at 14.355,32.461 h1 r270
U3: Bottom Overlay "*" at 31.948,33.282 h1.27; Bottom 3D Body "*" at 31.948,33.282 h1.27